# Altium PCB ActiveRoute PCB.PcbDoc
Units mil, origin at the board's own origin, x right, y up, seen from the top; angles counter-clockwise.
Board outline 4257 x 3174 mil, 4 copper layers (Top Layer, Signal Layer 1, Signal Layer 2, Bottom Layer), stack 30.634 mil thick; 5 components, 18 nets, 44 pads, 0 vias.
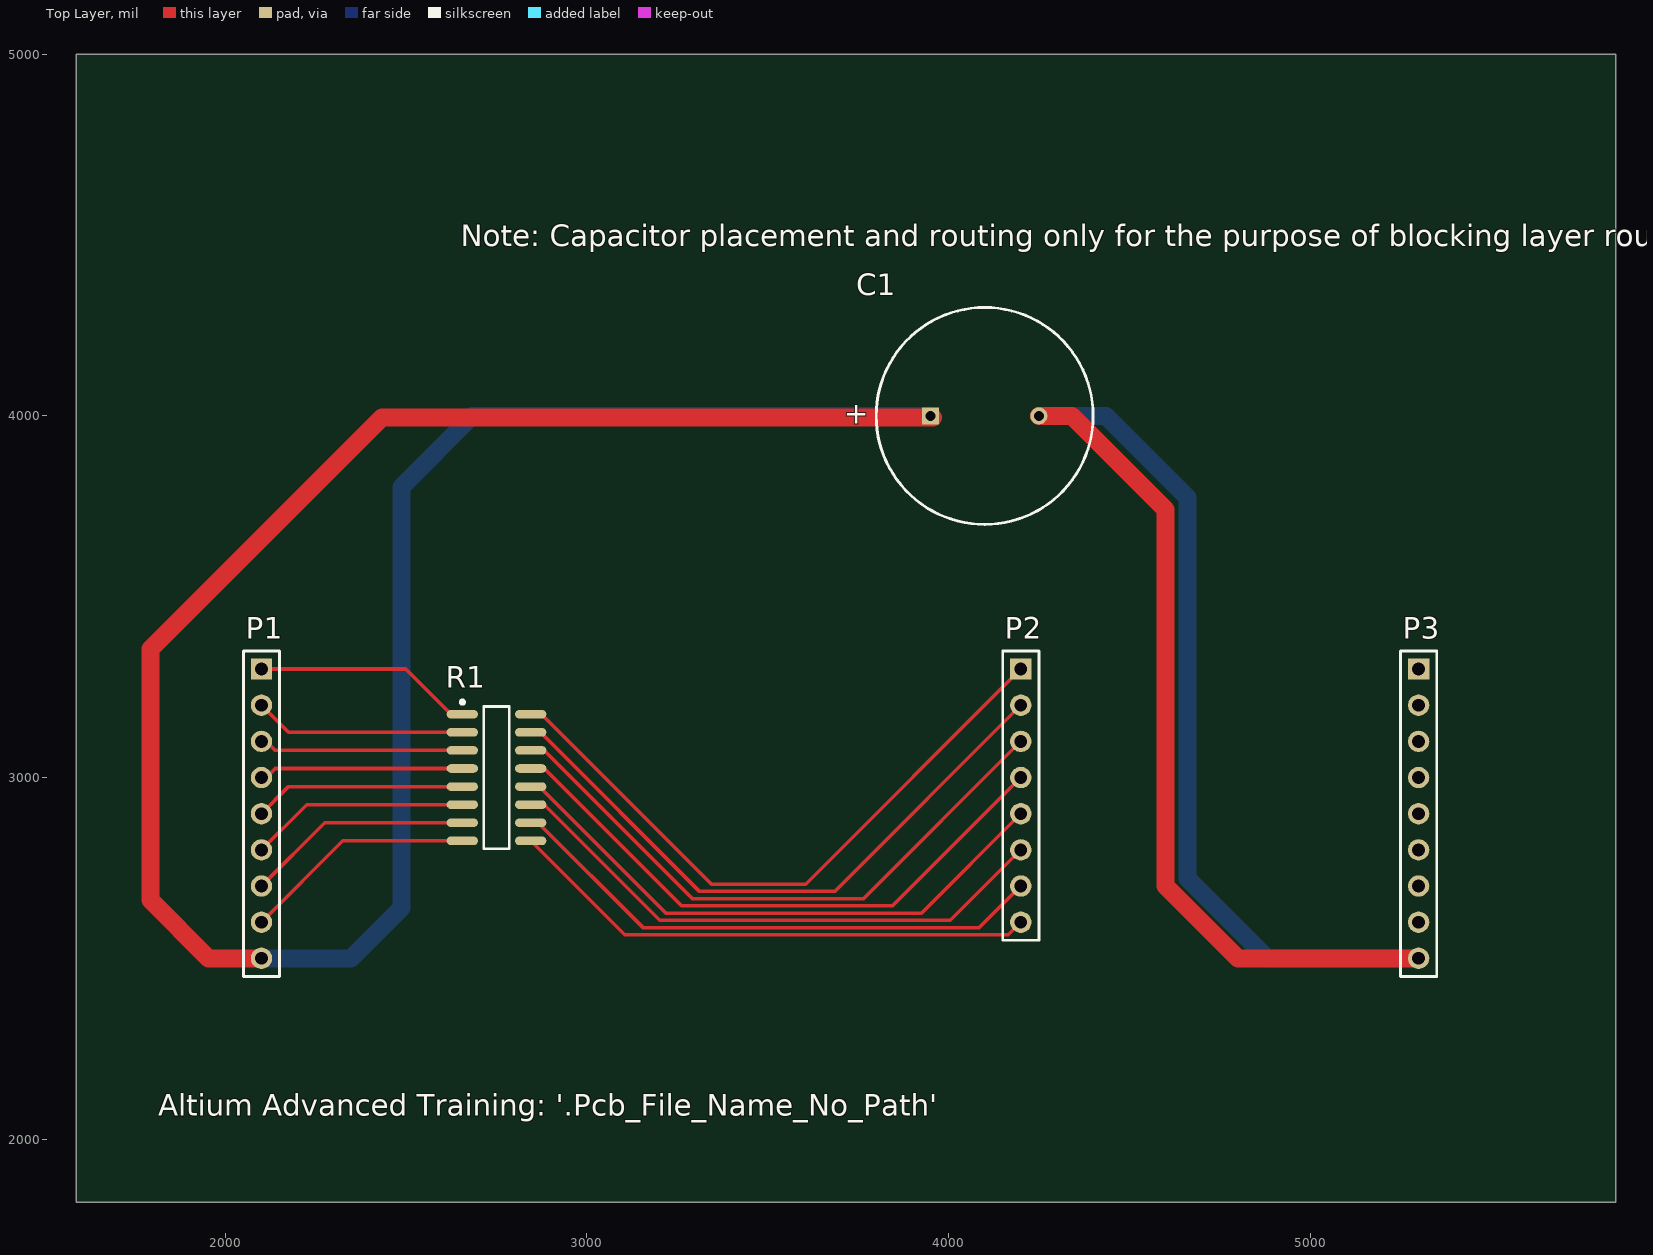
[diagram p0: Top Layer view]
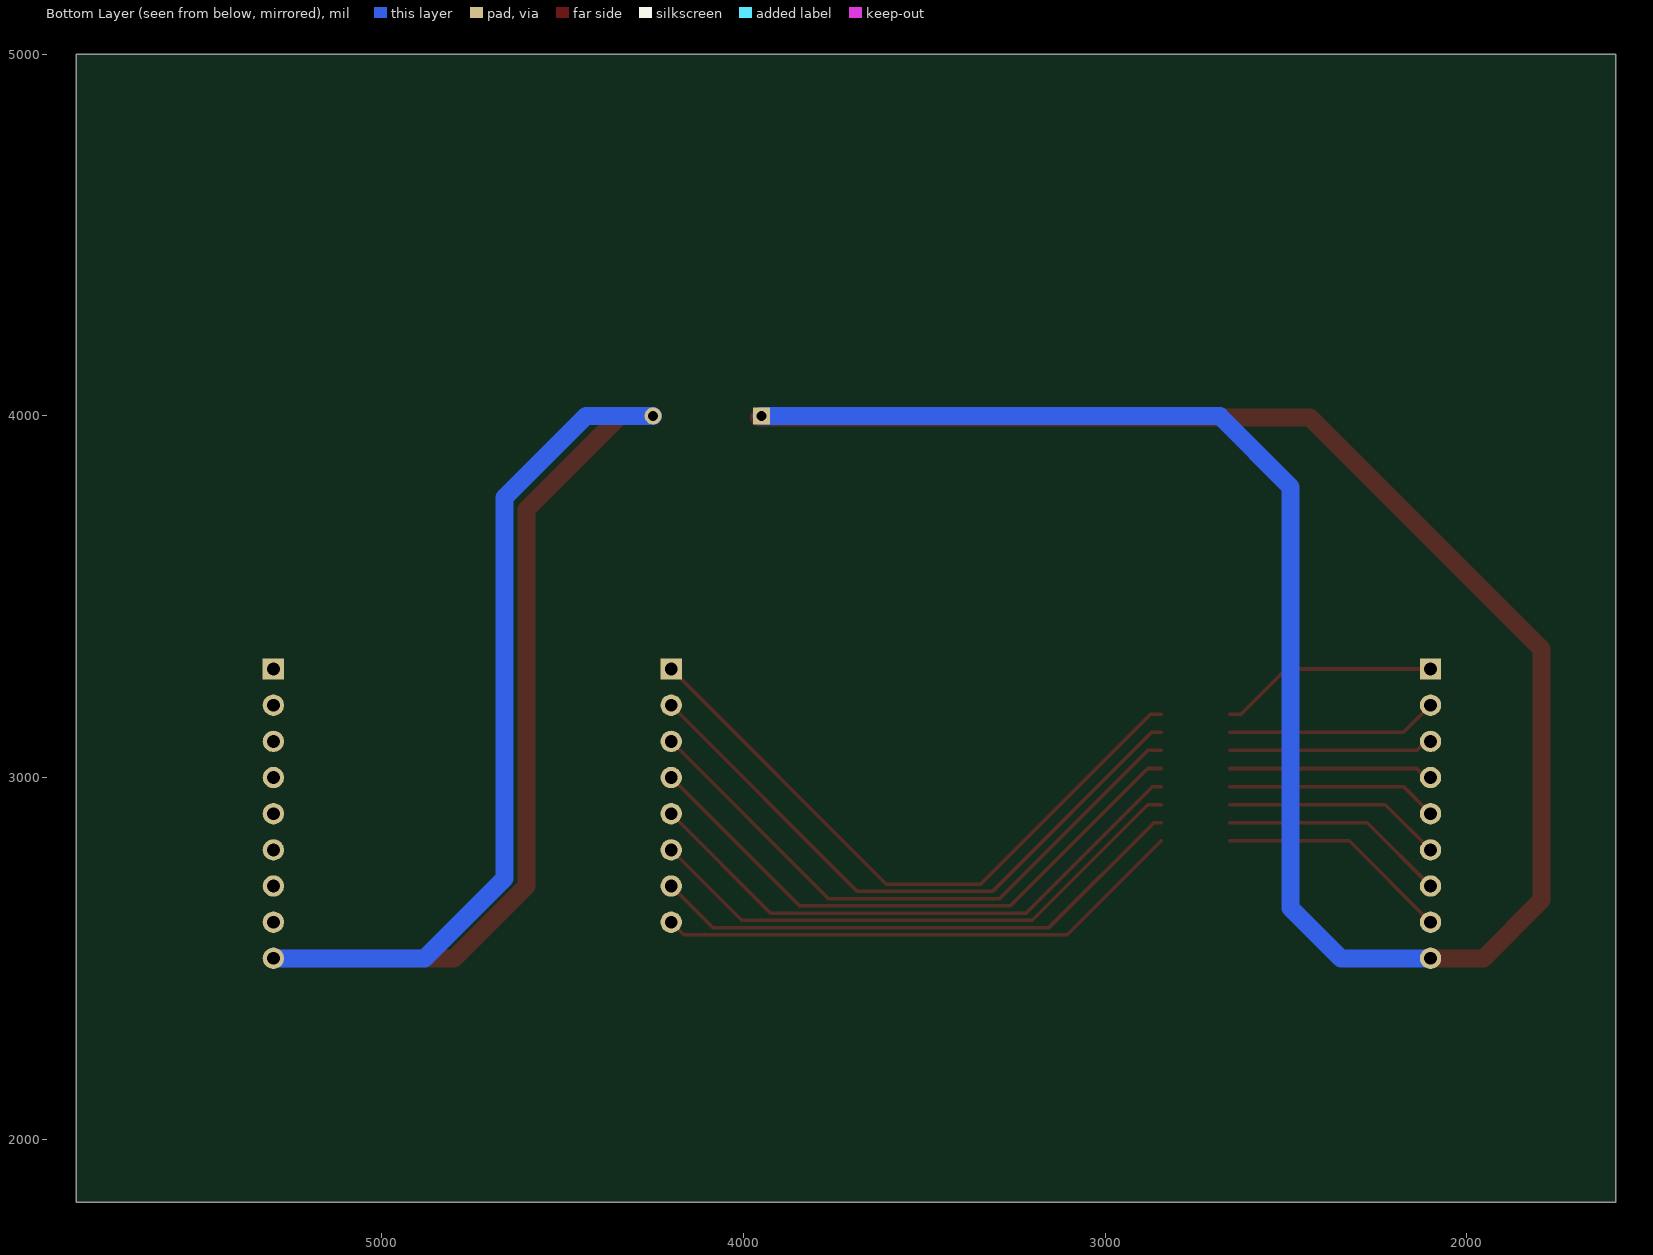
[diagram p1: Bottom Layer view, seen from below]
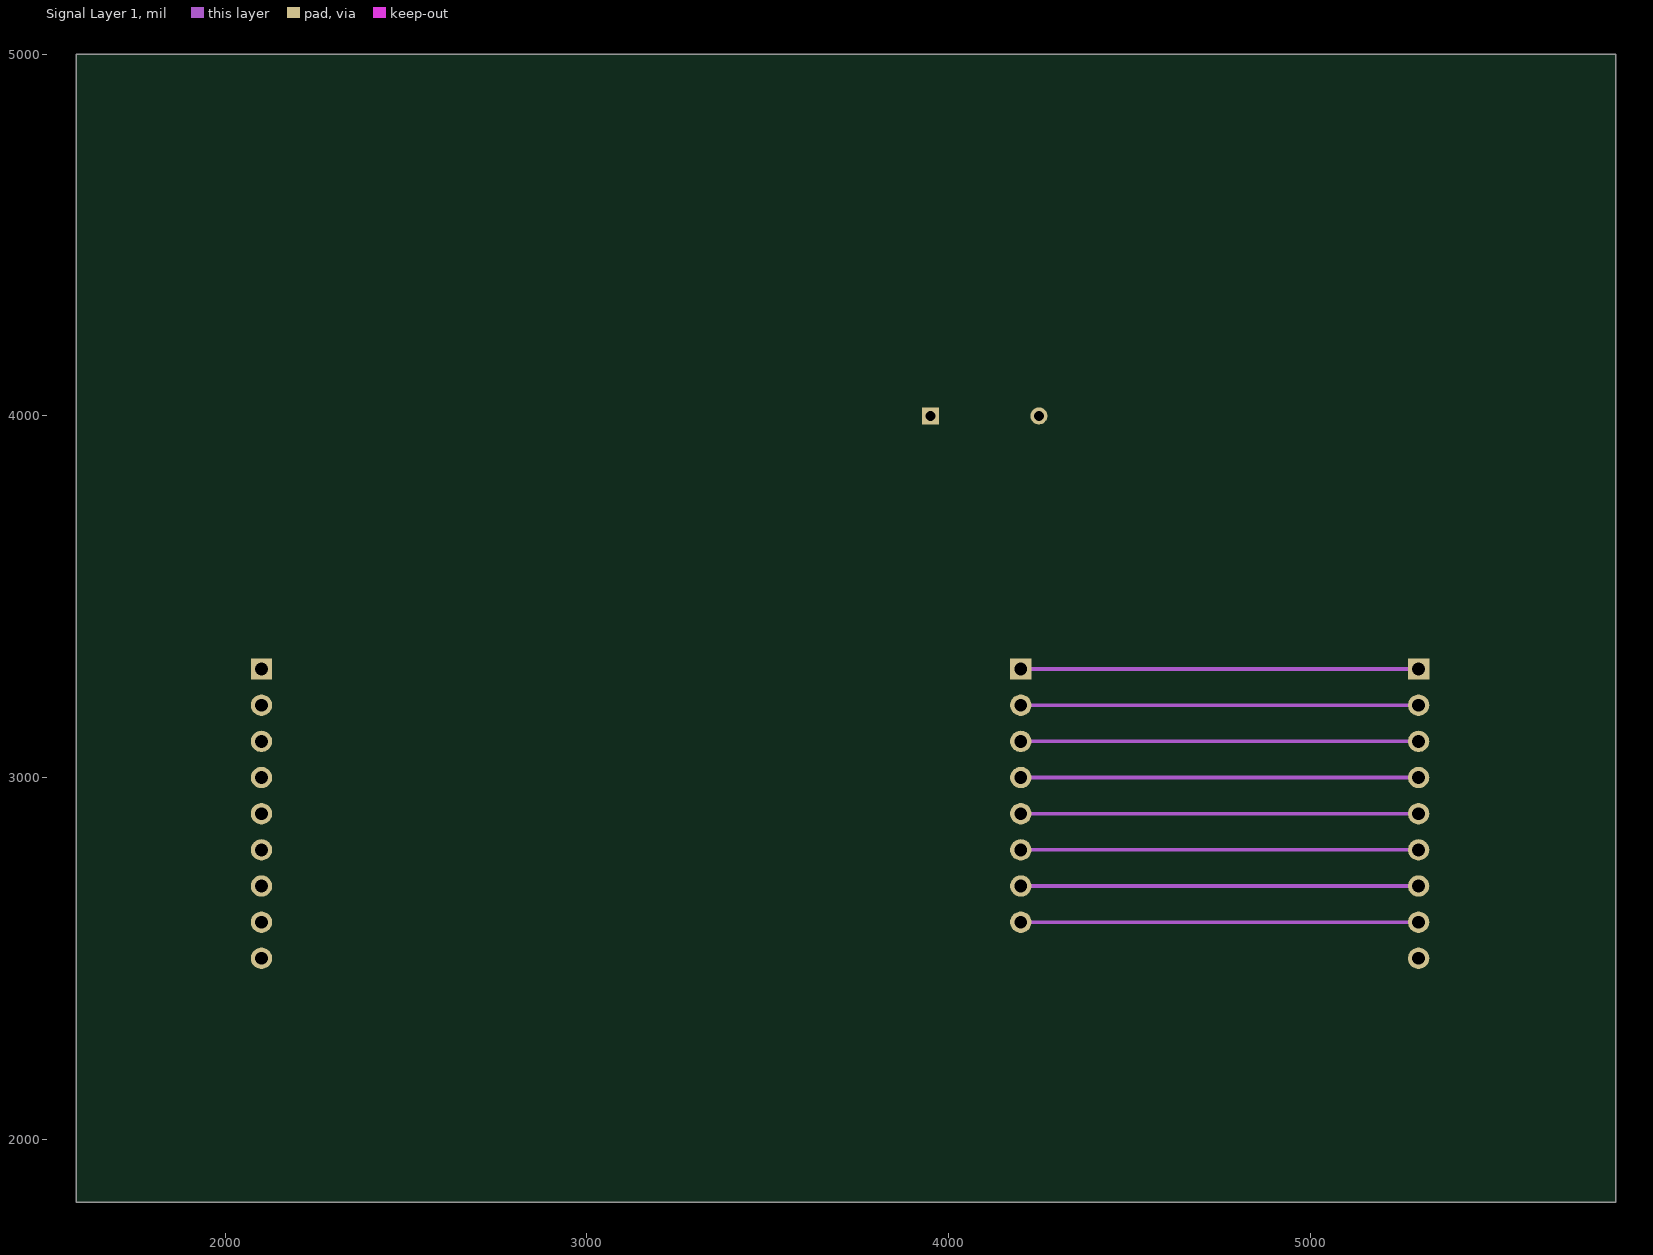
[diagram p2: Signal Layer 1]

## Layer stack, top to bottom
Top Solder: solder mask 0.4, Solder Resist, Dk 3.5
Top Layer: signal copper 1.4
Dielectric 1: core 10, FR-4, Dk 4.2
Signal Layer 1: signal copper 1.417
Dielectric 3: prepreg 5, Dk 4.2
Signal Layer 2: signal copper 1.417
Dielectric 2: core 10, Dk 4.2
Bottom Layer: signal copper 1.4
Bottom Solder: solder mask 0.4, Solder Resist, Dk 3.5

## Board outline
1588,1826 5845,1826 5845,5000 1588,5000

## Design rules (kind name [scope] priority, off if disabled: settings)
Clearance [All] p1: gap=10 ignorepadtopadclearanceinfootprint=FALSE except(0: Arc-Hole Track-Hole SMDPad-Hole THPad-Hole Via-Hole Fill-Hole Poly-Hole Region-Hole Text-Hole)
PolygonConnect [All] p1: connectstyle=Relief reliefconductorwidth=10 reliefentries=4 polygonreliefangle="90 Angle" airgapwidth=10
RoutingVias [All] p1: holewidth=28 width=50 viastyle="Through Hole" minholewidth=28 minwidth=50 maxholewidth=28 maxwidth=50
SolderMaskExpansion [All] p1: expansion=4 istentingtop=FALSE
Width [All] p1: maxlimit=60 minlimit=10 preferedwidth=10
30 further rules are at their usual default settings.

## Classes and differential pairs
net class P1nets: IOA0 IOA1 IOA2 IOA3 IOB0 IOB2 IOB5 IOB6
net class ADDR[7..0]: ADDR0 ADDR1 ADDR2 ADDR3 ADDR4 ADDR5 ADDR6 ADDR7

## Components (designator, comment, footprint, x,y, rotation, side; value= is the part's Value field where it differs from the comment)
C1 "Cap Pol1" RB7.6-15 4100,4000 r180 top value=100pF
P1 "Header 9" HDR1X9 2100,3300 r270 top
P2 "Header 8" HDR1X8 4200,3300 r270 top
P3 "Header 9" HDR1X9 5300,3300 r270 top
R1 "Res Pack1" SOIC16_N 2750,3000 r0 top value=1K

## Footprints (in the part's own frame and the unit in brackets; to place one, negate y for a bottom-side part, rotate by r counter-clockwise, add the part's x,y. Pads: shape width x height; smd on the part's side, far side on the other; paste and mask are expansions set on the pad)
HDR1X8 [mm] "Connector; Header; 8 Position"
  rect 1.5x1.5 hole 0.9: 1(0,0)
  round 1.5 hole 0.9: 2(2.54,0) 3(5.08,0) 4(7.62,0) 5(10.16,0) 6(12.7,0) 7(15.24,0) 8(17.78,0)
  silkscreen extent -1.27,-1.27 19.05,1.27
HDR1X9 [mm] "Connector; Header; 9 Position"
  rect 1.5x1.5 hole 0.9: 1(0,0)
  round 1.5 hole 0.9: 2(2.54,0) 3(5.08,0) 4(7.62,0) 5(10.16,0) 6(12.7,0) 7(15.24,0) 8(17.78,0) 9(20.32,0)
  silkscreen extent -1.27,-1.27 21.59,1.27
RB7.6-15 [mm] "Polarized Capacitor (Radial); 2 Leads"
  rect 1.2x1.2 hole 0.7: 1(3.81,0)
  round 1.2 hole 0.7: 2(-3.81,0)
  silkscreen extent -7.62,-7.62 7.62,7.62
SOIC16_N [mm] "SOIC, 16-Leads, Body 9.9x3.9mm, Pitch 1.27mm, IPC Medium Density"
  oval 2.2x0.6 smd: 1(-2.4,4.445) 2(-2.4,3.175) 3(-2.4,1.905) 4(-2.4,0.635) 5(-2.4,-0.635) 6(-2.4,-1.905) 7(-2.4,-3.175) 8(-2.4,-4.445) 9(2.4,-4.445) 10(2.4,-3.175) 11(2.4,-1.905) 12(2.4,-0.635) 13(2.4,0.635) 14(2.4,1.905) 15(2.4,3.175) 16(2.4,4.445)
  silkscreen extent -2.52,-5 0.9,5.42, body extent -2,-5 2,5, height 1.91

## Part data
C1: "Polarized Capacitor (Radial)", LatestRevisionDate=17-Jul-2002, LatestRevisionNote="Re-released for DXP Platform.", PackageDescription="Polarized Capacitor (Radial); 2 Leads", PackageReference=RB7.6-15, Published=8-Jun-2000, Publisher="Altium Limited"
P1 P3: "Header, 9-Pin", LatestRevisionDate=17-Jul-2002, LatestRevisionNote="Re-released for DXP Platform.", Publisher="Altium Limited"
P2: "Header, 8-Pin", LatestRevisionDate=17-Jul-2002, LatestRevisionNote="Re-released for DXP Platform.", Publisher="Altium Limited"
R1: "Isolated Resistor Network - Parts", Code_IPC=SOIC127P600-16, Code_JEDEC=MS-012-AC, LatestRevisionDate=29-May-2009, LatestRevisionNote="IPC-7351 Footprint Added.", PackageDescription="16-Pin Small Outline Integrated Circuit 1.27 mm Pitch", PackageReference=SOIC16, Published=24-Mar-1999, Publisher="Altium Limited", Sim Note="Enter the Resistance value into parameter field."

## Nets (pads, with @x,y where several pads share a name; then routed paths per layer and width w, separated by ;. In a path a pad name is that pad's centre, name@x,y a point inside that pad or via, vN(x,y) a via of type N, cw(c..) or ccw(c..) an arc to the next point about the centre after c; other vN are vias at no path point)
ADDR0: P2.1 P3.1 R1.16 | length 2896.6
  Top Layer w10: R1.16 2874.61,3175 3344.55,2705.06 3605.06,2705.06 P2.1
  Signal Layer 1 w10: P2.1 P3.1
ADDR1: P2.2 P3.2 R1.15 | length 2851
  Top Layer w10: R1.15 2871.52,3125 3311.46,2685.06 3685.06,2685.06 P2.2
  Signal Layer 1 w10: P2.2 P3.2
ADDR2: P2.3 P3.3 R1.14 | length 2805.5
  Top Layer w10: R1.14 2881.89,3075 3291.83,2665.06 3765.06,2665.06 P2.3
  Signal Layer 1 w10: P2.3 P3.3
ADDR3: P2.4 P3.4 R1.13 | length 2759.9
  Top Layer w10: R1.13 2881.89,3025 3261.83,2645.06 3845.06,2645.06 P2.4
  Signal Layer 1 w10: P2.4 P3.4
ADDR4: P2.5 P3.5 R1.12 | length 2714.3
  Top Layer w10: R1.12 2868.54,2975 3218.48,2625.06 3925.06,2625.06 P2.5
  Signal Layer 1 w10: P2.5 P3.5
ADDR5: P2.6 P3.6 R1.11 | length 2668.8
  Top Layer w10: R1.11 2881.89,2925 3201.83,2605.06 4005.06,2605.06 P2.6
  Signal Layer 1 w10: P2.6 P3.6
ADDR6: P2.7 P3.7 R1.10 | length 2623.2
  Top Layer w10: R1.10 2864.91,2875 3154.85,2585.06 4085.06,2585.06 P2.7
  Signal Layer 1 w10: P2.7 P3.7
ADDR7: P2.8 P3.8 R1.9 | length 2577.7
  Top Layer w10: R1.9 3104.43,2565.06 4165.06,2565.06 P2.8
  Signal Layer 1 w10: P2.8 P3.8
GND: C1.2 P3.9 | length 4569.3
  Top Layer w50: C1.2 4341,4000 4600,3741 4600,2700 4800,2500 P3.9
  Bottom Layer w50: C1.2 4435,4000 4661,3774 4661,2721 4882,2500 P3.9
IOA0: P1.1 R1.1 | length 607.3
  Top Layer w10: P1.1 2499.02,3300 2624.02,3175 R1.1
IOA1: P1.2 R1.2 | length 586.6
  Top Layer w10: P1.2 2175,3125 R1.2
IOA2: P1.3 R1.3 | length 565.9
  Top Layer w10: P1.3 2112.97,3100 2137.97,3075 R1.3
IOA3: P1.4 R1.4 | length 565.9
  Top Layer w10: P1.4 2112.97,3000 2137.97,3025 R1.4
IOB0: P1.5 R1.5 | length 586.6
  Top Layer w10: P1.5 2175,2975 R1.5
IOB2: P1.6 R1.6 | length 607.3
  Top Layer w10: P1.6 2225,2925 R1.6
IOB5: P1.7 R1.7 | length 628
  Top Layer w10: P1.7 2275,2875 R1.7
IOB6: P1.8 R1.8 | length 648.7
  Top Layer w10: P1.8 2325,2825 R1.8
VCC: C1.1 P1.9 | length 6651.5
  Top Layer w50: P1.9 1954,2500 1793,2661 1793,3356 2433,3996 C1.1@3957,3996
  Bottom Layer w50: P1.9 2348,2500 2487,2639 2487,3804 2683,4000 C1.1

## Silkscreen, mask and mechanical layers (free items; w line width, h text height)
Top Overlay:
  text "Note: Capacitor placement and routing only for the purpose of blocking layer routing." at 2651,4469 h60
  text "Altium Advanced Training: '.Pcb_File_Name_No_Path'" at 1815,2063.99 h60
Mechanical 1:
  lines w10: 3100,3000 3100,2600 3200,2500 3700,2500 3800,2600 3800,3000

## Text inside footprints (layer, text, board x,y; h text height)
C1: Top Overlay "+" at 3779.85,4029.01 h59.06 r180